# Altium PCB PCB_Interface_Board_7500-0428.PcbDoc (part 5 of 5)
Units mil, origin at the board's own origin, x right, y up, seen from the top; angles counter-clockwise.
Board outline 3850 x 4150 mil, 4 copper layers (Top Layer 1, GND+Signal, PWR+Signal, Bottom Layer 1), stack 62.449 mil thick; 247 components, 137 nets, 1675 pads, 241 vias.
Unrouted connection lines stored in the file: 122.
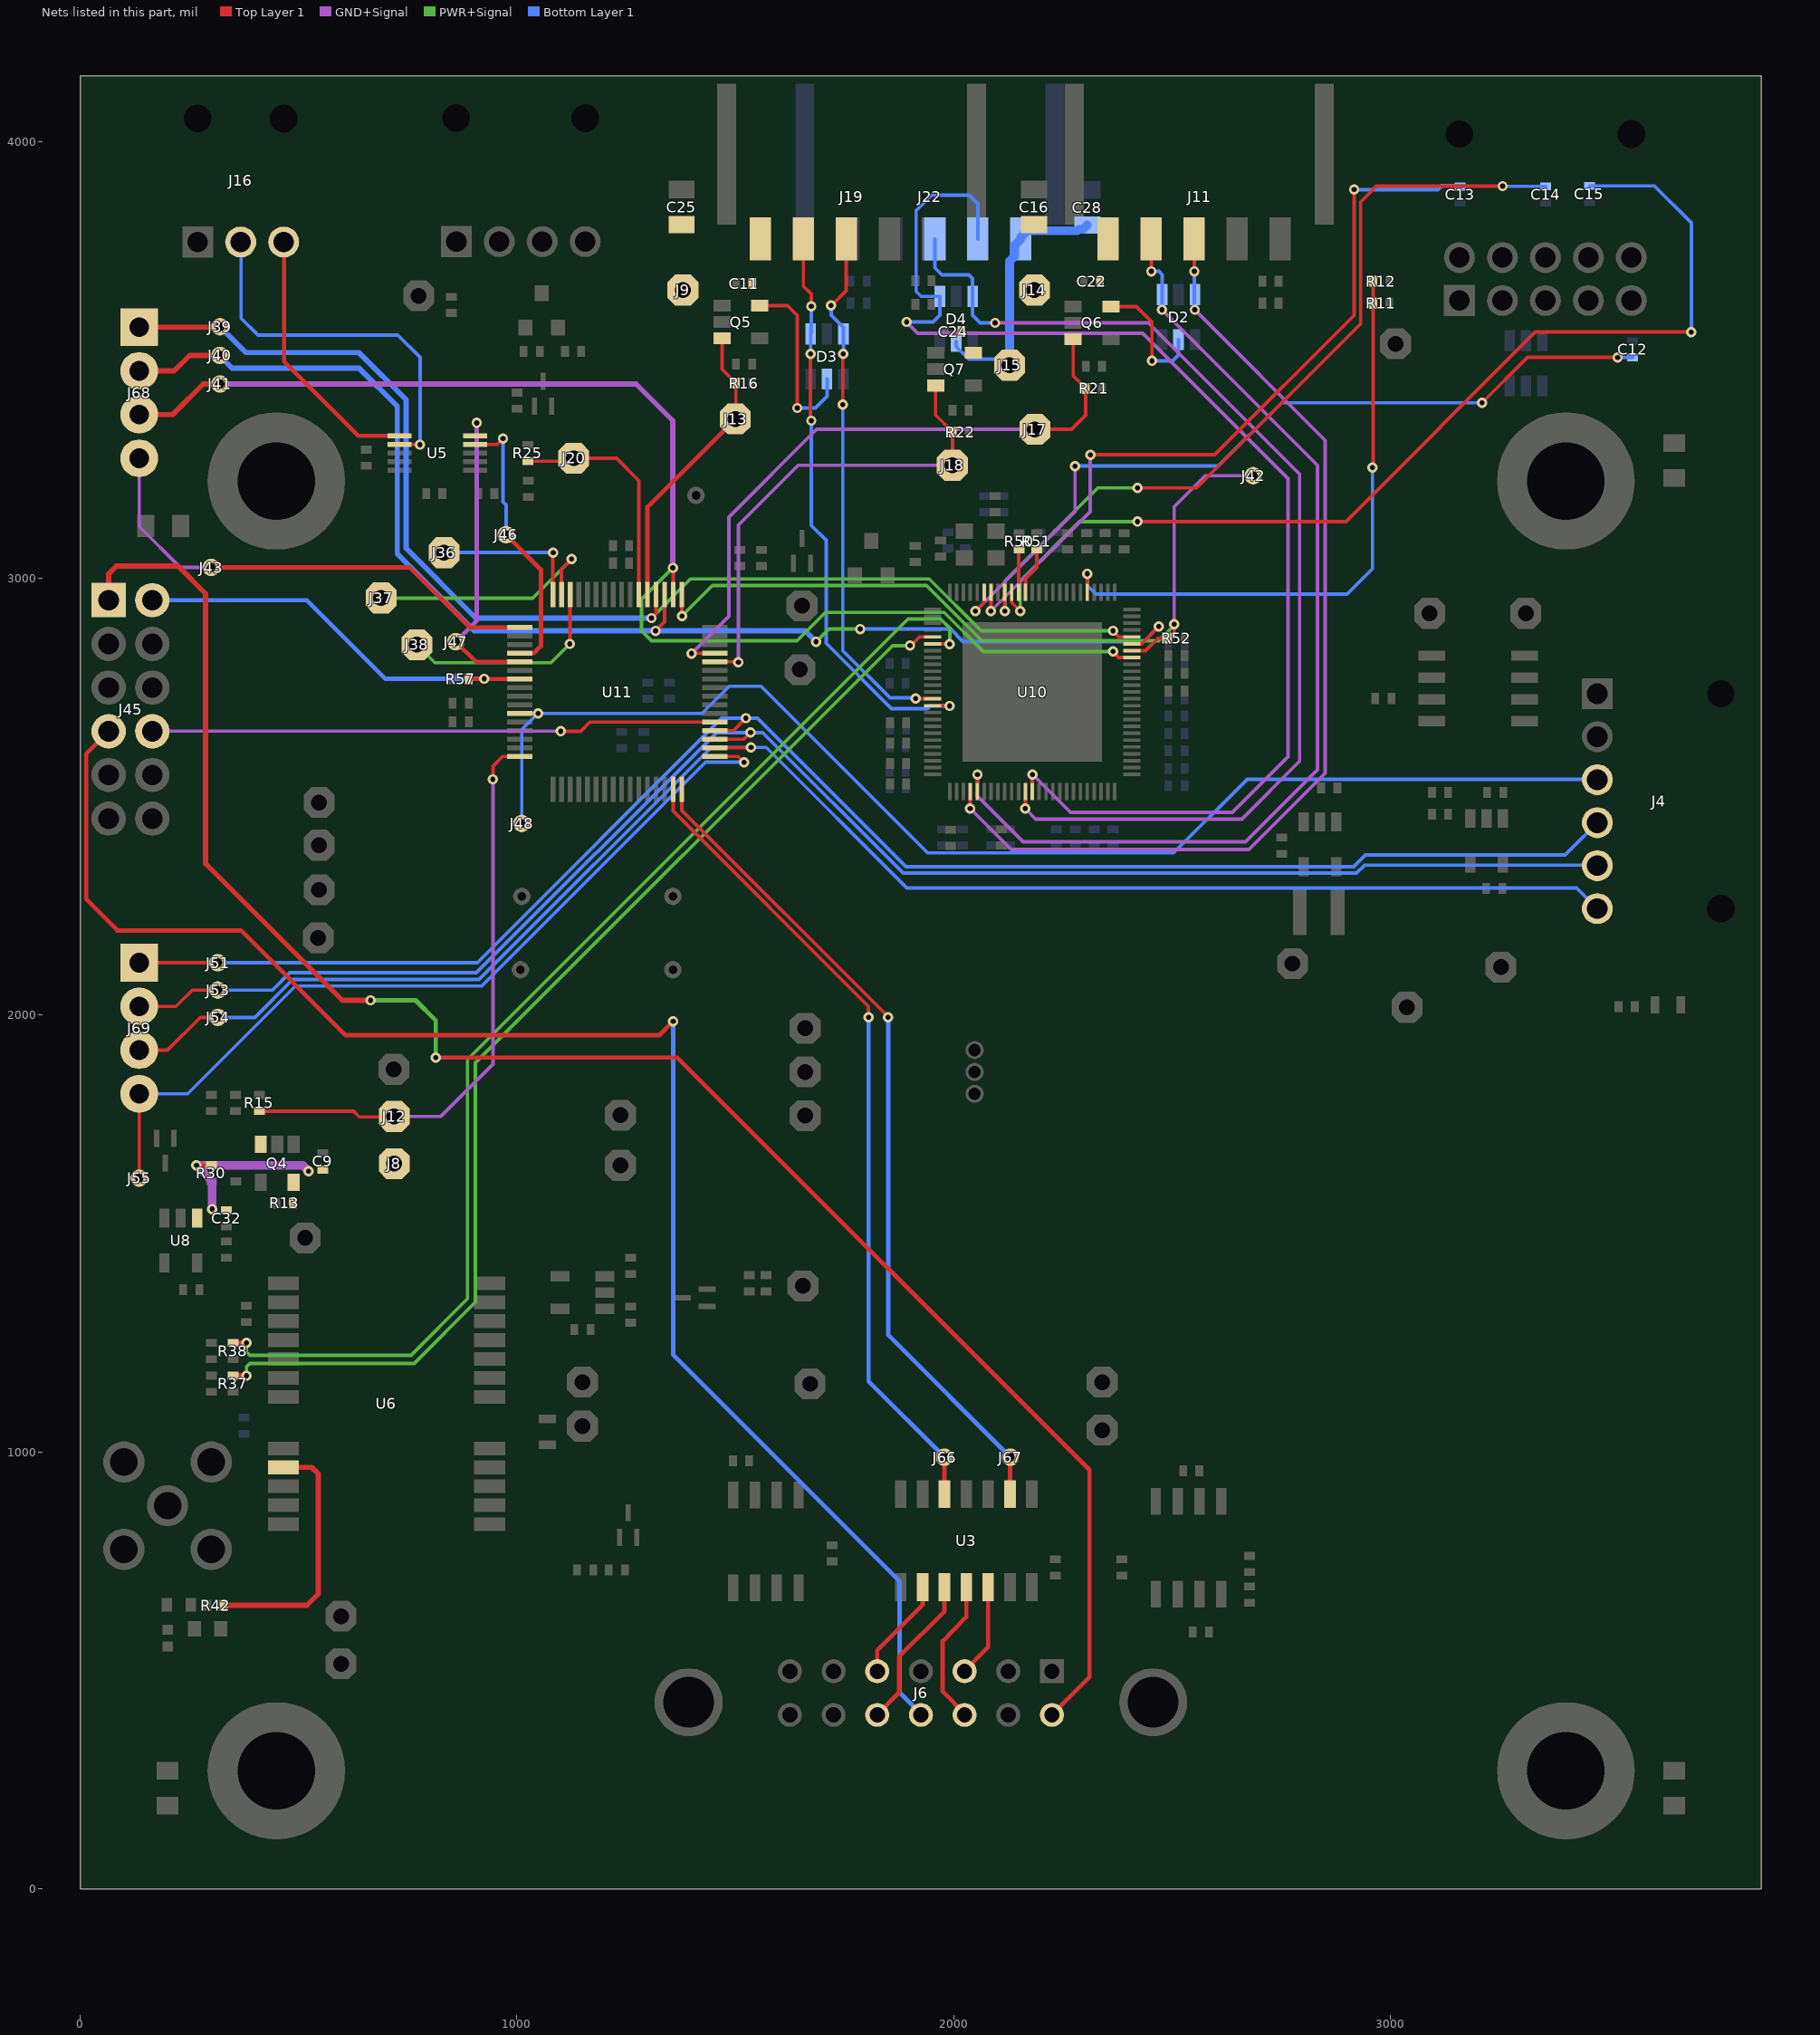
[diagram p5: the nets of this part, all layers, seen from the top]

## Via types
v1: diameter 23.62, hole 11.81, Top Layer 1 to Bottom Layer 1, tented top, 214 vias
v2: diameter 23.62, hole 11.81, Top Layer 1 to Bottom Layer 1, 27 vias

## Nets (pads, with @x,y where several pads share a name; then routed paths per layer and width w, separated by ;. In a path a pad name is that pad's centre, name@x,y a point inside that pad or via, vN(x,y) a via of type N, cw(c..) or ccw(c..) an arc to the next point about the centre after c; other vN are vias at no path point) (continued)
RB7(PGD)_IB: J45.8 U11.37 | length 1297.7
  Top Layer 1 w8: v1(1100,2650) 1146,2650 1167.1,2671.1 U11.37@1453.23,2671.1
  GND+Signal w8: J45.8@165.24,2650.24 v1@1101,2650.24
RB7(PGD)_MB: J6.8 J45.7 | length 3713.6
  Top Layer 1 w10: J45.7@65,2650 13.63,2598.63 13.63,2265.37 85,2194 368,2194 608,1954 1325.67,1954 v1(1357.67,1986)
  Bottom Layer 1 w10: v1(1357.67,1986) 1357.67,1222.76 1876,704.43 1876,450 J6.8@1926,400
RE2: J36.1 U11.64 | length 346
  Top Layer 1 w8: U11.64@1082.36,2963.23 1082.36,3058.36 v1(1083,3059)
  Bottom Layer 1 w8: J36.1@833,3059 v1(1083,3059)
RE3: J37.1 U11.63 | length 563.1
  Top Layer 1 w8: U11.63@1102.05,2963.23 1102.05,3021.05 v1(1125,3044)
  PWR+Signal w8: J37.1@689,2955 1036,2955 v1(1125,3044)
RE4: J38.1 U11.62 | length 498.3
  Top Layer 1 w8: v1(1121,2850) 1121.73,2850.73 U11.62@1121.73,2963.23
  PWR+Signal w8: J38.1@771,2848 812,2807 1078,2807 v1(1121,2850)
RS232_CH1_IN: J16.3 U5.6 | length 608.7
  Top Layer 1 w10: J16.3@466.85,3770 466.85,3496.15 636.63,3326.37 U5.6@731.38,3326.37
RS232_CH1_OUT: J16.2 U5.7 | length 868
  Top Layer 1 w8: U5.7@731.38,3306.69 777.31,3306.69 v1(778,3306)
  Bottom Layer 1 w8: J16.2@368.42,3770 368.42,3595.58 407,3557 727,3557 778,3506 v1(778,3306)
RX+: J6.5 U3.12 | length 212.7
  Top Layer 1 w10: J6.5@2026,500 2079,553 U3.12@2079,690.7
RX-: J6.6 U3.11 | length 333.6
  Top Layer 1 w10: J6.6@2026,400 1975,452.02 1975,566.94 2026.14,619 2029,621.92 U3.11@2029,690.7
S\P\I\1\_\S\S\: J4.3 J48.1 U11.11 | length 2988
  Top Layer 1 w8: U11.11@1006.77,2690.79 v1(1048.08,2690.79)
  Bottom Layer 1 w8: J48.1@1011,2439 1011,2653.71 v1(1048.08,2690.79) 1423.79,2690.79 1486,2753 1559,2753 1940.5,2371.5 2503.34,2371.5 2672.05,2540.21 J4.3@3474,2540.21
S\P\I\1\_\S\S\_\A\U\X\: J55.1 J69.4 U11.33 | length 1971.8
  Top Layer 1 w8: J55.1@130,1622 J55.1@135,1627 J69.4@135,1820 ; U11.33@1453.23,2592.36 1506.64,2592.36 v1(1520,2579)
  Bottom Layer 1 w8: J69.4@135,1820 246,1820 492.59,2066.59 919.59,2066.59 1432,2579 v1(1520,2579)
S\P\I\2\_\S\S\: J42.1 R52.1 U10.69 U11.49 | length 1887
  Top Layer 1 w8: U11.49@1377.64,2963.23 1377.64,2914.36 v1(1378,2914) ; U10.69@2408,2834.49 2439.49,2834.49 2468,2863 R52.1@2491.5,2863 2505,2876.5 v1(2505,2895)
  GND+Signal w8: v1(2505,2895) 2505,3164 2576,3235 J42.1@2686,3235
  PWR+Signal w8: v1(1378,2914) 1447.62,2983.62 1937.91,2983.62 2064.44,2857.09 2469.34,2857.09 2505,2892.74 v1(2505,2895)
S\P\I\2\_\S\S\_\A\U\X\: J43.1 J68.4 U11.1 | length 1123.7
  Top Layer 1 w10: J43.1@300,3025 755,3025 892.36,2887.64 U11.1@1006.77,2887.64
  GND+Signal w8: J68.4@135,3275 135,3118.87 228.87,3025 J43.1@300,3025
SPI1_SCK: J4.6 J54.1 J69.3 U11.34 | length 3872.9
  Top Layer 1 w8: J69.3@135,1920 200,1920 275,1995 J54.1@315,1995 ; U11.34@1453.23,2612.05 1535.05,2612.05 v1(1536,2613)
  Bottom Layer 1 w8: J54.1@315,1995 399.79,1995 486.38,2081.59 913.38,2081.59 1444.79,2613 v1(1536,2613) 1571,2613 1892.81,2291.19 3426.69,2291.19 J4.6@3481.66,2236.21
SPI1_SDI: J4.5 J53.1 J69.2 U11.35 | length 3827.8
  Top Layer 1 w8: J69.2@135,2020 219,2020 256.5,2057.5 J53.1@315,2057.5 ; U11.35@1453.23,2631.73 1519.73,2631.73 v1(1535,2647)
  Bottom Layer 1 w8: J53.1@315,2057.5 440.5,2057.5 480,2097 907.21,2097 1457.21,2647 v1(1535,2647) 1562.57,2647 1884.57,2325 2922.43,2325 2940.79,2343.36 J4.5@3474,2343.36
SPI1_SDO: J4.4 J51.1 J69.1 U11.36 | length 3855.5
  Top Layer 1 w8: J69.1@135,2120 J51.1@315,2120 ; U11.36@1453.23,2651.42 1495.42,2651.42 v1(1524,2680)
  Bottom Layer 1 w8: J51.1@315,2120 790.38,2120 790.79,2120.41 909.41,2120.41 1469,2680 v1(1524,2680) 1550.79,2680 1890.79,2340 2916.21,2340 2943.21,2367 3400.28,2367 J4.4@3487.7,2454.42
SPI2_SCK: J41.1 J68.3 U10.68 U11.50 | length 3059.5
  Top Layer 1 w8: v1(1357,3024) 1357.95,3023.05 U11.50@1357.95,2963.23 ; v1@2365,2831.73 2377.99,2818.74 U10.68@2408,2818.74
  Top Layer 1 w12: J68.3@135,3375 212,3375 282,3445 J41.1@320,3445
  GND+Signal w12: J41.1@320,3445 1273,3445 1357,3361 v1(1357,3024)
  PWR+Signal w8: v1(1357,3024) 1285.19,2952.19 1285.19,2879.77 1307.92,2857.04 1641.37,2857.04 1706.33,2922 1978.31,2922 2067.66,2832.65 v1(2365,2832.65)
SPI2_SDI: J40.1 J68.2 U10.70 U11.51 | length 3028.8
  Top Layer 1 w8: v1(1317.37,2879.85) 1338.27,2900.74 U11.51@1338.27,2963.23 ; U10.70@2408,2850.24 2430.24,2850.24 v1(2470,2890)
  Top Layer 1 w12: J68.2@135,3475 215,3475 250.5,3510.5 J40.1@320,3510.5
  PWR+Signal w8: v1(1685.08,2854.92) 1714.15,2884 v1(1786,2884)
  Bottom Layer 1 w8: v1(1786,2884) 1993,2884 2021.54,2855.46 2435.46,2855.46 v1(2470,2890)
  Bottom Layer 1 w12: J40.1@320,3510.5 320,3509 348,3481 639,3481 726,3394 726,3056 902.15,2879.85 v1(1317.37,2879.85) 1660.15,2879.85 v1(1685.08,2854.92)
SPI2_SDO: J39.1 J68.1 U10.71 U11.52 | length 2899.2
  Top Layer 1 w8: v1(1308,2909) 1318.58,2919.58 U11.52@1318.58,2963.23 ; v1@2365,2878.98 2377.99,2865.98 U10.71@2408,2865.98
  Top Layer 1 w12: J68.1@135,3575 319,3575 J39.1@320,3576
  PWR+Signal w8: v1(1308,2909) 1397.62,2998.62 1944.12,2998.62 2062.84,2879.9 v1(2365,2879.9)
  Bottom Layer 1 w12: J39.1@320,3576 379,3517 638,3517 746,3409 746,3069 906,2909 v1(1308,2909)
TEMP_PWR_EN: J20.1 R25.1 U11.54 | length 538.7
  Top Layer 1 w8: R25.1@1025,3268.35 1123.35,3268.35 J20.1@1130,3275 1228,3275 1279.21,3223.79 U11.54@1279.21,2963.23
TX+: J6.9 U3.9 | length 233.8
  Top Layer 1 w10: J6.9@1825,500 1825,545.94 1928.73,649.67 1928.73,690.43 U3.9@1929,690.7
TX-: J6.10 U3.10 | length 354.1
  Top Layer 1 w10: J6.10@1826,400 1875,449 1875,530.94 1979,634.94 U3.10@1979,690.7
UART1_RXD: J67.1 U3.2 U11.32 | length 1920.5
  Top Layer 1 w8: U11.32@1377.64,2516.77 1377.64,2468.58 1850,1996.21 v1(1850,1995)
  Top Layer 1 w10: U3.2@2129,903.3 2129,987 J67.1@2130,988
  Bottom Layer 1 w10: v1@1850,1990 1850,1268 J67.1@2130,988
UART1_TXD: J66.1 U3.5 U11.31 | length 1870.7
  Top Layer 1 w8: U11.31@1357.95,2516.77 1357.95,2467.05 1805,2020 v1(1805,1995)
  Top Layer 1 w10: U3.5@1979,903.3 J66.1@1979,988
  Bottom Layer 1 w10: v1(1805,1995) 1805,1162 J66.1@1979,988
UART2_RXD: J47.1 U5.5 U11.5 | length 686.7
  Top Layer 1 w10: J47.1@860,2855 906.1,2808.9 U11.5@1006.77,2808.9
  GND+Signal w10: J47.1@860,2855 908,2903 v1(908,3356)
UART2_TXD: J46.1 U5.4 U11.4 | length 635
  Top Layer 1 w8: U5.4@904.61,3306.69 954.69,3306.69 v1(968,3320)
  Top Layer 1 w10: J46.1@975,3100 1055,3020 1055,2845 1038.58,2828.58 U11.4@1006.77,2828.58
  Bottom Layer 1 w8: v1(968,3320) 968,3175 975,3168 J46.1@975,3100
USB2DN-1_DM: R38.2 U10.6 | length 2767.6
  Top Layer 1 w8: U10.6@1952,2850.24 v1@1990.49,2850.24
  Top Layer 1 w12: R38.2@350,1249.61 v1(380.81,1249.61)
  PWR+Signal w8: v1(380.81,1249.61) 380.81,1229.02 388.62,1221.21 757.46,1221.21 886.79,1350.54 886.79,1898.54 1895.24,2907 1970,2907 1991,2886 v1(1991,2849.72)
USB2DN-1_DP: R37.2 U10.5 | length 2635.7
  Top Layer 1 w8: v1(1900,2846) 1902.04,2846 1922.02,2865.98 U10.5@1952,2865.98
  Top Layer 1 w12: R37.2@350,1174.61 v1(380.81,1174.61)
  PWR+Signal w8: v1(380.81,1174.61) 380.81,1195.19 388.62,1203 765,1203 905,1343 905,1891 1860,2846 v1(1900,2846)
USB2DN-2_DM: D2.1 J11.2 U10.30 | length 2361.5
  Top Layer 1 w8: U10.30@2054.01,2512 v1@2054.01,2550.49 ; v1@2452.42,3703.15 J11.2@2452.42,3776.95
  GND+Signal w8: v1(2054.53,2551) 2054.53,2501.47 2158.99,2397.01 2668.54,2397.01 2832.99,2561.46 2832.99,3259.01 v1(2477,3615)
  Bottom Layer 1 w8: v1(2452.57,3703) 2470,3703 2477.6,3695.4 D2.1@2477.6,3649.57 2477.6,3615.6 v1(2477,3615)
USB2DN-2_DP: D2.3 J11.3 U10.29 | length 2310.4
  Top Layer 1 w8: v1@2038.27,2473.51 U10.29@2038.27,2512 ; J11.3@2550.85,3776.95 2550.85,3703.15 v1(2551,3703)
  GND+Signal w8: v1(2037.76,2473) 2131.76,2379 2676,2379 2851,2554 2851,3316 v1(2552,3615)
  Bottom Layer 1 w8: v1(2551,3703) 2551,3616 v1(2552,3615)
USB2DN-3_DM: D3.1 J19.2 U10.15 | length 1349
  Top Layer 1 w8: J19.2@1655.76,3776.95 1655.76,3669.24 1674,3651 v1(1674,3623) ; v1(1672.2,3514) 1672.2,3362.8 v1(1674,3361) ; U10.15@1952,2708.5 v1@1990.49,2708.5
  Bottom Layer 1 w8: v1@1672.6,3514.4 D3.1@1672.6,3559.57 ; D3.1@1672.6,3574.6 D3.1@1672.6,3559.57 ; v1(1674,3361) 1674,3121.12 1707.89,3087.24 1707.89,2851.59 1857.52,2701.95 1900.34,2701.95 1940.34,2701.95 1946.38,2707.99 v1(1991,2707.99) ; v1(1674,3623) 1674,3560.98 D3.1@1672.6,3559.57
USB2DN-3_DP: D3.3 J19.3 U10.14 | length 1224.8
  Top Layer 1 w8: v1(1719.41,3625) 1721,3625 1721,3624 1722,3623 1722,3626 1754.19,3658.19 J19.3@1754.19,3776.95 ; v1(1746,3398) 1746,3513 v1(1747,3514) ; v1@1913.51,2724.25 U10.14@1952,2724.25
  Bottom Layer 1 w8: v1(1719.41,3625) 1719.41,3602.59 1747.4,3574.6 D3.3@1747.4,3559.57 1747.4,3514.4 v1(1747,3514) ; v1(1746,3398) 1746,2834.69 1854.07,2726.62 1911.14,2726.62 v1(1913,2724.76)
USB2DN-4_DM: D4.1 J22.2 U10.38 | length 2986.7
  Top Layer 1 w8: U10.38@2180,2512 v1@2180,2550.49
  GND+Signal w8: v1(1892,3587) 1918,3561 2433,3561 2766,3228 2766,2592 2638,2464 2267.51,2464 v1(2180.51,2551)
  Bottom Layer 1 w8: v1(1892,3587) 1953,3587 1968.6,3602.6 D4.1@1968.6,3645.57 1925.43,3645.57 1914,3657 1914,3842 1949,3877 2036,3877 2055.46,3857.54 J22.2@2055.46,3776.95
USB2DN-4_DP: D4.3 J22.3 U10.37 | length 2534.7
  Top Layer 1 w8: v1@2164.25,2473.51 U10.37@2164.25,2512
  GND+Signal w8: v1(2095,3585) 2445.77,3585 2792,3238.77 2792,2581.23 2659.77,2449 2187.74,2449 v1(2163.74,2473)
  Bottom Layer 1 w8: J22.3@1957.03,3776.95 1957.03,3710.97 1973,3695 2035,3695 2043.4,3686.6 D4.3@2043.4,3645.57 2043.4,3602.6 2061,3585 v1(2095,3585)
USB2DN_VBUS1: C9.1 C32.1 J8.1 Q4.5 R13.2 R30.2 U8.1 | length 413.9
  Top Layer 1 w8: v1(266,1656) 266,1656.61 R30.2@300,1656.61 ; v1(302,1556) v1@304,1556
  GND+Signal w20: v1(302,1556) 302,1620 v1(266,1656) 510,1656 v1(523,1643)
USB2DN_VBUS2: C16.2 C22.1 D2.5 J11.1 J14.1 Q6.5 | length 298.9
  Top Layer 1 w8: Q6.5@2360.29,3622.4 2418.6,3622.4 2454,3587 v1(2454,3498)
  Bottom Layer 1 w8: v1(2454,3498) 2501.5,3498 2515,3511.5 D2.5@2515,3546.43
USB2DN_VBUS3: C11.1 C25.2 D3.5 J9.1 J19.1 Q5.5 | length 425.6
  Top Layer 1 w8: Q5.5@1556.29,3624.4 1619.6,3624.4 1642,3602 v1(1642,3390)
  Bottom Layer 1 w8: v1(1642,3390) 1683,3390 1710,3417 D3.5@1710,3456.43
USB2DN_VBUS4: C24.1 C28.2 D4.5 J15.1 J22.1 Q7.5 | length 625.8
  Bottom Layer 1 w8: D4.5@2006,3542.43 2006,3530.61 2034.9,3501.72 2114.28,3501.72 J15.1@2128,3488 J15.1@2132.81,3483.19
  Bottom Layer 1 w20: J15.1@2128,3488 2128,3726.27 2139.47,3737.74 2139.47,3762.54 J22.1@2153.88,3776.95 2153.88,3781.22 2168.29,3795.63 2282.63,3795.63 2286,3799 2296,3799 C28.2@2306,3809
USB2UP_DM: R50.1 U10.90 | length 99.1
  Top Layer 1 w8: U10.90@2148.5,2968 2148.5,3065 R50.1@2150,3066.5
USB2UP_DP: R51.1 U10.89 | length 109.2
  Top Layer 1 w8: U10.89@2164.25,2968 2164.25,2999.25 2190,3025 R51.1@2190,3066.5
USB3UP-A_RXDM: C12.2 U10.95 | length 1857.7
  Top Layer 1 w8: v1(2050,2925) 2069.76,2944.76 U10.95@2069.76,2968 ; v1(3210,3402) 3313.8,3505.8 v1(3520.4,3505.8)
  GND+Signal w8: v1(2050,2925) 2278,3153 v1(2278,3257)
  Bottom Layer 1 w8: v1(2278,3257) 2606,3257 2751,3402 v1(3210,3402) ; v1(3520.4,3505.8) C12.2@3555,3505.8
USB3UP-A_RXDP: C13.2 U10.94 | length 1767.3
  Top Layer 1 w8: v1(2085,2925) 2085.51,2925.51 U10.94@2085.51,2968 ; v1(2313,3283) 2598,3283 2917,3602 v1(2917,3890)
  GND+Signal w8: v1(2085,2925) 2313,3153 v1(2313,3283)
  Bottom Layer 1 w8: v1(2917,3890) 3109,3890 3118,3899 3158,3899 C13.2@3160,3897
USB3UP-A_TXDM: C14.2 U10.92 | length 1893.3
  Top Layer 1 w8: v1@2117.01,2925.51 U10.92@2117.01,2968 ; v1(2421,3207) 2556,3207 2932,3583 2932,3862 2968,3898 v1(3257,3898)
  PWR+Signal w8: v1(2117.52,2925) 2117.52,2994.45 2330.07,3207 v1(2421,3207) v1@2426,3207
  Bottom Layer 1 w8: v1(3257,3898) 3257.5,3897.5 C14.2@3356,3897.5
USB3UP-A_TXDP: C15.2 U10.91 | length 2411.2
  Top Layer 1 w8: U10.91@2132.76,2968 2132.76,2944.76 v1(2152.52,2925) ; v1(2421,3130) 2898,3130 3332,3564 v1(3689,3564)
  PWR+Signal w8: v1(2152.52,2925) 2152.52,2994.52 2288,3130 v1(2421,3130)
  Bottom Layer 1 w8: C15.2@3456,3898.5 3604.66,3898.5 3689,3814.16 v1(3689,3564)
V\B\U\S\1\_\F\L\T\: J12.1 Q4.3 R15.1 U11.16 | length 1343.7
  Top Layer 1 w8: R15.1@410,1780.4 625.6,1780.4 639,1767 718,1767 J12.1@719,1768 ; v1(945,2540) 945,2570 967.36,2592.36 U11.16@1006.77,2592.36
  GND+Signal w8: J12.1@719,1768 825,1768 945,1888 v1(945,2540)
V\B\U\S\2\_\F\L\T\: J17.1 Q6.3 R21.1 U11.45 | length 1501
  Top Layer 1 w8: v1(1400,2828) 1400.58,2828.58 U11.45@1453.23,2828.58 ; J17.1@2186,3341 2270,3341 2302.6,3373.6 R21.1@2302.6,3435 2273.71,3463.89 Q6.3@2273.71,3547.6
  GND+Signal w8: v1(1400,2828) 1485,2913 1485,3140 1686,3341 J17.1@2186,3341
V\B\U\S\3\_\F\L\T\: J13.1 Q5.3 R16.1 U11.53 | length 710.3
  Top Layer 1 w8: Q5.3@1469.71,3549.6 1469.71,3478.6 R16.1@1501.5,3446.81 J13.1@1501.5,3337.49
  Top Layer 1 w10: U11.53@1298.9,2963.23 1298.9,3163.9 J13.1@1500,3365
V\B\U\S\4\_\F\L\T\: J18.1 Q7.3 R22.1 U11.44 | length 1124.6
  Top Layer 1 w8: U11.44@1453.23,2808.9 1506.1,2808.9 v1(1507,2808) ; Q7.3@1958.71,3441.6 1958.71,3373.89 R22.1@1997.6,3335 J18.1@1997.6,3248
  GND+Signal w8: v1(1507,2808) 1507,3122 1644,3259 J18.1@1997,3259
VBUS_MON_UP: R11.2 R12.1 U10.80 | length 1412.9
  Top Layer 1 w8: U10.80@2305.98,2968 v1(2305.98,3010.45) ; v1(2959,3254) 2960.39,3255.39 R11.2@2960.39,3630 R12.1@2960.39,3680
  Bottom Layer 1 w8: v1(2305.98,3010.45) 2305.98,2983.75 2325.73,2964 2901,2964 2959,3022 v1(2959,3254)
VCC_RF: R42.1 U6.9 | length 588.4
  Top Layer 1 w12: R42.1@328.5,649 519,649 545,675 545,950 530.26,964.74 U6.9@465,964.74
VPP: J45.2 R57.2 U11.7 | length 952
  Top Layer 1 w10: R57.2@889.5,2770 889.97,2769.53 U11.7@1006.77,2769.53
  Bottom Layer 1 w10: J45.2@165,2950 519,2950 699,2770 v1(925,2770)
VPP_MB: J6.2 J45.1 | length 4179.3
  Top Layer 1 w10: v1(814,1903) 1367,1903 2311,959 2311,485 J6.2@2226,400
  Top Layer 1 w12: J45.1@65,2950 65,3010 83,3028 224,3028 287,2965 287,2347 600,2034 v1(665,2034) v1@667,2032
  PWR+Signal w10: v1(665,2034) 768,2034 814,1988 v1(814,1903)
pads on no net: D1.4 D1.6 D2.4 D2.6 D3.4 D3.6 D4.4 D4.6 J4.7 J4.8 J6.15 J6.16 J10.10 J10.11 J10.12 J11.S1 J11.S2 J16.7 J16.8 J19.S1 J19.S2 J21.7 J21.8 J22.S1 J22.S2 J45.11 J45.12 U1.4 U3.1 U3.8 U3.13 U6.1 U6.2 U6.14 U6.17 U6.18 U6.19 U7.4 U8.4 U10.2 U10.3 U10.4 U10.7 U10.8 U10.10 U10.11 U10.12 U10.13 U10.16 U10.17 U10.19 U10.20 U10.23 U10.27 U10.28 U10.31 U10.32 U10.34 U10.35 U10.36 U10.39 U10.40 U10.42 U10.43 U10.45 U10.46 U10.47 U10.48 U10.49 U10.50 U10.51 U10.52 U10.54 U10.57 U10.61 U10.66 U10.72 U10.73 U10.74 U10.75 U10.76 U10.77 U10.81 U10.82 U10.84 U10.85 U10.87 U10.88 U10.97 U11.2 U11.3 U11.6 U11.8 U11.40 U11.43 U11.46 U11.47 U11.55 U11.58 U11.59 U11.60 U11.61

## Polygon pours and split planes (outlines as drawn)
GND on PWR+Signal "GND_L03_P011" (solid, pour order 11): 0,0 0,4150 3850,4150 3850,0
5V on PWR+Signal "5V_L03_P008" (solid, pour order 8): 249,676 249,3545 3556,3545 3556,676
3V3 on PWR+Signal "Polygon_1_Net_3.3V" (solid, remove dead copper, pour order 0): 1743,3215 2551,3215 2551,2555 3353,2555 3353,2045 3047,2045 3047,2398 1743,2398
GND on Top Layer 1 "GND_L01_P003" (solid, remove dead copper, pour order 3): 0,0 0,4150 3850,4150 3850,0
USB2DN_VBUS1 on Top Layer 1 "USB2DN_VBUS1_L01_P007" (solid, remove dead copper, pour order 7): 790,1696 790,1608 589,1608 589,1553 470,1553 470,1659 647,1659 647,1714 789,1714
GNSS_VDDUSB_3V3 on Top Layer 1 "GNSS_VDDUSB_3V3_L01_P006" (solid, remove dead copper, pour order 6): 500,1140 500,1095 185,1095 185,1330 255,1330 255,1460 445,1460 445,1540 575,1540 575,1425 355,1425 355,1285 250,1285 250,1130 430,1130 430,1140
GNSS_VCC_3V3 on Top Layer 1 "GNSS_VCC_3V3_L01_P005" (solid, remove dead copper, pour order 5): 898,1361 898,1284 1104,1284 1104,1117 1187,1117 1187,1230 1143,1230 1143,1360 899,1360
GND on GND+Signal "GND_L02_P009" (solid, pour order 9): 0,0 0,4150 3850,4150 3850,0
1V2 on GND+Signal "Polygon_1_Net_1.2V" (solid, remove dead copper, pour order 1): 2705,2355 3005,2355 3005,2045 1556,2045 1556,3255 2705,3255 2705,2645
GND on Bottom Layer 1 "GND_L04_P004" (solid, remove dead copper, pour order 4): 0,0 0,4150 3850,4150 3850,0

## Other copper
Top Layer 1:
  rectangle net 1V2: 2245,3056 2405,3079
  rectangle net GND: 2245,3093 2405,3116
  rectangle net NetJ34_1: 1825,2925 1930,3050
  rectangle net NetQ12_1: 1495,3010 1640,3045
  rectangle net 3V3: 2075,3030 2120,3165
  rectangle net -5V_MB: 2369,642 2475,728
  rectangle net NetJ29_1: 1049,1052 1093,1087
  rectangle net GNSS_ANT_OK: 900,948.31 1015,982.31
  rectangle net NetLED1_1: 3550,1996 3625,2050
  rectangle net 5V: 2992,2697 3136.7,2984
  rectangle net PWR_IN_5V: 3325,2695 3519,2776
  rectangle net PWR_IN_5V: 3247,2643 3359,2986
  rectangle net UART2_RXD: 877,3322 938,3372
  rectangle net USB2DN_VBUS2: 2145.25,3758 2370,3794
  rectangle net GND: 2826.6,2417 2853.6,2562
  rectangle net 5V: 2864,2417 2891,2562
  rectangle net 1V2: 2735,2083 2816.2,2382
  region net NetL1_1: 2902,2365 2861.8,2365 2861.8,2181 2902,2181
  region net 3V3: 3269.8,2373 3242.8,2373 3242.8,2088 3269.8,2088
  rectangle net GND: 3207.6,2228 3234.6,2570
  rectangle net 5V: 3245,2425 3272,2570
  rectangle net NetR5_2: 3123,2422 3196,2526
  rectangle net 5V: 864,3178 932,3254
  rectangle net USB2DN_VBUS3: 1338,3758 1586,3794
  rectangle net 5V: 1075,3507 1121,3593
  rectangle net 5V: 1044,3507 1121,3539
  rectangle net NetQ8_3: 1001,3506 1034,3596
  rectangle net V\B\U\S\1\_\F\L\T\: 391,1684 428,1791
  rectangle net USB2DN_VBUS1: 252,1544 351,1569
  rectangle net USB2DN_VBUS1: 252,1509 297,1569
  rectangle net 5V: 340,1603 458,1639
  rectangle net 5V: 388,1557 458,1639
  rectangle net NetC17_2: 2726.66,3607 2769.66,3828
  rectangle net USB2DN_VBUS4: 2008,3480 2035,3581
  rectangle net 5V: 2016.1,3319 2069,3461
  rectangle net USB2DN_VBUS4: 2084,3435 2172,3480
  rectangle net USB2DN_VBUS4: 2008,3480 2172,3549
  rectangle net NetC27_2: 1930,3607 1973,3828
  rectangle net 5V: 1523,3420 1628,3567
  rectangle net USB2DN_VBUS3: 1529.34,3608 1587.34,3827
  rectangle net USB2DN_VBUS3: 1337,3614.6 1418.71,3833.6
  rectangle net USB2DN_VBUS2: 2142,3614.6 2223.71,3833.6
  rectangle net USB2DN_VBUS2: 2326,3608 2384,3827
  rectangle net 5V: 2327,3418 2381,3565
  rectangle net PC_VBUS: 2988,3495 3037,3647
  rectangle net GNSS_ANT_DET: 900,905 1015,939
  rectangle net NetC34_1: 240,575 300,675
  rectangle net 5V: 1179,1315 1276,1344
  rectangle net 5V: 1246,1326 1276,1417
  rectangle net NetQ2_4: 1249,841 1268,882
  rectangle net 5V_MB: 1463,581 1737,758
  rectangle net 5V: 1522,870 1664.5,993
Bottom Layer 1:
  region net 3V3: 2504,2438 2306.6,2438 2306.6,2415 2504,2415
  region net 3V3: 2504,2421 2504,2579.96 2481,2579.96 2481,2421
  rectangle net 1V2: 2056,3142.5 2128,3161
  region net 1V2: 2294.2,2438 2073,2438 2073,2415 2294.2,2415
  region net GND: 2363,3118 2182,3118 2182,3095 2363,3095
  rectangle net 1V2: 1880,2744 1902,2821
  rectangle net 3V3: 1970,3056 2044,3081
  region net 3V3: 2363,3081 2182,3081 2182,3058 2363,3058
  rectangle net 5V: 1285,2713.15 1389,2734.15
  region net 1V2: 1904,2471 1904,2670 1881,2670 1881,2471
  region net 3V3: 2479,2850.85 2479,2669.85 2502,2669.85 2502,2850.85
  rectangle net 5V: 1260,2558 1304,2621
  rectangle net 5V: 1225,2600 1304,2621
  rectangle net 1V2: 2480,2590 2502,2660.89
  rectangle net 3V3: 1934.6,2413 2035,2436
  rectangle net GND: 1225,2637 1304,2658
  rectangle net PC_VBUS: 3295,3402.49 3325.43,3465
  rectangle net GNSS_VCC_3V3: 314,1060 390.98,1094
  rectangle net GNSS_ANT_OK: 983,948 1015,981
  region net NetC29_2: 1781.22,3828 1738.22,3828 1738.22,3607 1781.22,3607
  rectangle net PC_VBUS: 2913,3477 3194,3676
  rectangle net GNSS_ANT_DET: 983,905 1015,938

## Silkscreen, mask and mechanical layers (free items; w line width, h text height)
Top Overlay:
  region: 3764.14,1543.51 3634.14,1543.51 3634.14,1943.51 3764.14,1943.51
  lines w8: 3624.14,718.51 3704.14,813.51 3794.14,733.51 3722.14,733.51 3722.14,768.51 3686.14,768.51 3686.14,668.51 3722.14,668.51 3722.14,703.51 3794.14,703.51 3704.14,623.51 3624.14,718.51
  text "VBUS2" at 2093,3712.7 h60
  text "VBUS3" at 1298,3710.7 h60
  text "EXTTEMP5V" at 412,3628.7 h60
  text "SDO2" at 354,3560.7 h60
  text "VBUS4" at 2047,3555.7 h60
  text "SDI2" at 352,3492.5 h60
  text "PCVBUS" at 2922,3449.7 h60
  text "SCK2" at 355,3430.7 h60
  text "!VBUS3FLT" at 1544,3347.7 h60
  text "!VBUS2FLT" at 2231.41,3322.96 h60
  text "TEMPPWREN" at 1174,3257 h60
  text "!VBUS4FLT" at 1666.41,3238.96 h60
  text "!HUBRES" at 1162,3140.7 h60
  text "TXD2" at 1007,3081 h60
  text "RE2" at 687,3036 h60
  text "!SS2" at 335,3010.7 h60
  text "RE3" at 543,2932.7 h60
  text "5V" at 3137.33,2902.03 h60
  text "PWRIN5V" at 3357.33,2902.03 h60
  text "RXD2" at 809,2898 h60
  text "!URST" at 1606,2848.7 h60
  text "RE4" at 625,2825 h60
  text "ATTEST" at 1549,2707.7 h60
  text "RF6" at 594.33,2469.03 h60
  text "RF5" at 594.33,2371.03 h60
  text "!SS" at 966.33,2367.03 h60
  text "RF4" at 594.33,2268.32 h60
  text "!GNSSRES" at 1042,2257.7 h60
  text "EXTTEMP" at 1392,2257 h60
  text "RA1" at 592.33,2158.32 h60
  text "SDO1" at 350,2105.7 h60
  text "1V2" at 2823.32,2099.32 h60
  text "3V3" at 3300.32,2092.03 h60
  text "ANTOK" at 1392,2089.7 h60
  text "ANTDET" at 1043,2089 h60
  text "SDI1" at 350,2043.2 h60
  text "GND" at 3092.32,2005.03 h60
  text "SCK1" at 350,1980.7 h60
  text "RC1" at 1707.33,1951.97 h60
  text "VBUSEN" at 765.33,1858.03 h60
  text "RA4" at 1707.33,1851.32 h60
  text "GNSSTX" at 1282.43,1753.49 h60
  text "RA5" at 1707.33,1752.03 h60
  text "!VBUS1FLT" at 765.83,1749.53 h60
  text "VBUS1" at 766.33,1642.03 h60
  text "GNSSRX" at 1282.43,1638.49 h60
  text "!SS1" at 6,1608.7 h60
  text "GNSSRVDD" at 562.33,1472.03 h60
  text "PWREN" at 1702.33,1361.32 h60
  text "GNSS3V3" at 1197.33,1142.03 h60
  text "5VMB" at 2387.33,1142.03 h60
  text "MBPWREN" at 1718.33,1137.32 h60
  text "GNSSPLS" at 1197.33,1041.03 h60
  text "-5VMB" at 2387.33,1032.03 h60
  text "TX" at 1948,1021 h60
  text "RX" at 2099,1021 h60
  text "TransTech Systems, Inc" at 3661.14,838.51 h29.75 r90
  text "PCB: 1700-0002 REV. A" at 3711.14,838.51 h29.75 r90
  text "PCA: 7500-0428 REV. A" at 3761.14,838.51 h29.75 r90
  text "GNSSINT" at 641.33,602.33 h60
  text "GNSSGND" at 644.33,497.03 h60
  text "PCB Edge" at 1710.57,34.17 h39.37
Board Outline:
  the board outline again, w10
Fabrication:
  drawing of 295 lines, arcs and shapes, not listed
  text "Layer" at 4321.58,1416 h60
  text "Name" at 4731.49,1416 h60
  text "Material" at 5661.23,1416 h60
  text "Thickness" at 6521,1416 h60
  text "Constant" at 7170.84,1416 h60
  text "Board Layer Stack" at 7740.7,1416 h60
  text "Top Overlay" at 4731.49,1296 h60
  text "Top Solder" at 4731.49,1176 h60
  text "Solder Resist" at 5661.23,1176 h60
  text "0.40mil" at 6521,1176 h60
  text "3.5" at 7170.84,1176 h60
  text "1" at 4321.58,1056 h60
  text "Top Layer 1" at 4731.49,1056 h60
  text "CF-004" at 5661.23,1056 h60
  text "1.38mil" at 6521,1056 h60
  text "Dielectric 2" at 4731.49,936 h60
  text "PP-006" at 5661.23,936 h60
  text "8.28mil" at 6521,936 h60
  text "4.1" at 7170.84,936 h60
  text "2" at 4321.58,816 h60
  text "GND+Signal" at 4731.49,816 h60
  text "0.60mil" at 6521,816 h60
  text "Dielectric 1" at 4731.49,696 h60
  text "FR-4" at 5661.23,696 h60
  text "41.93mil" at 6521,696 h60
  text "4.8" at 7170.84,696 h60
  text "3" at 4321.58,576 h60
  text "PWR+Signal" at 4731.49,576 h60
  text "0.60mil" at 6521,576 h60
  text "Dielectric 3" at 4731.49,456 h60
  text "PP-006" at 5661.23,456 h60
  text "8.28mil" at 6521,456 h60
  text "4.1" at 7170.84,456 h60
  text "4" at 4321.58,336 h60
  text "Bottom Layer 1" at 4731.49,336 h60
  text "CF-004" at 5661.23,336 h60
  text "1.38mil" at 6521,336 h60
  text "Bottom Solder" at 4731.49,216 h60
  text "Solder Resist" at 5661.23,216 h60
  text "0.40mil" at 6521,216 h60
  text "3.5" at 7170.84,216 h60
  text "Bottom Overlay" at 4731.49,96 h60
  text "Total board thickness:" at 4321.58,-24 h60
  text "63.25mil" at 6521,-24 h60
Mechanical 4:
  circle w0.5: c3402,270 r157.48
Top 3D Body:
  drawing of 416 lines, arcs and shapes, not listed
  text "J8" at 1319.79,4053.04 h63.75
  text "J7" at 2119.79,4053.04 h63.75
  text "1" at 180,3800 h42.5 r180
  text "1" at 770,3800 h42.5 r180
  text "1" at 1440,3780 h42.5 r180
  text "1" at 2240,3780 h42.5 r180
  text "1" at 2270,3780 h42.5 r180
  text "1" at 3070,3710 h42.5 r180
  text "5" at 3680,3710 h42.5 r180
  text "1" at 110,3675 h42.5 r270
  text "1" at 1475,3639 h25.5 r90
  text "1" at 1955,3639 h25.5
  text "1" at 2275,3639 h25.5 r90
  text "1" at 2460,3639 h25.5
  text "VBUS3" at 1195.93,3580.36 h42.5
  text "VBUS2" at 2008.93,3561.36 h42.5
  text "1" at 1660,3549 h25.5
  text "1" at 1970,3534 h25.5 r90
  text "1" at 3260,3519 h25.5
  text "PCVBUS" at 2687.44,3510.36 h42.5
  text "VBUS4" at 2068.97,3398.57 h34
  text "!VB3FLT" at 1550,3340.36 h42.5
  text "!VB2FLT" at 2495,3325.71 h42.5
  text "1" at 894,3242 h25.5 r270
  text "!VB4FLT" at 1683.28,3225.36 h42.5
  text "TMPWREN" at 599.92,3201.07 h42.5
  text "PIC_RE4" at 601.93,3072.75 h29.75
  text "1" at 38,3050 h42.5 r270
  text "2" at 138,3050 h42.5 r270
  text "76" at 2376,2988 h29.75
  text "5VIN" at 3164.5,2970 h42.5
  text "49" at 1389,2949 h29.75
  text "1" at 1936,2940 h29.75
  text "PIC_RE3" at 461.93,2927.75 h29.75
  text "1" at 1023,2899 h29.75
  text "5V" at 2962.39,2895.36 h42.5
  text "PIC_RE2" at 521.93,2852.75 h29.75
  text "!URST" at 1598.14,2847.5 h29.75
  text "1" at 3107,2842 h29.75 r90
  text "1" at 3548,2835 h68 r90
  text "ATEST" at 1624.23,2707.5 h29.75
  text "33" at 1437,2543 h29.75
  text "51" at 2426,2506 h29.75
  text "17" at 1073,2495 h29.75
  text "PIC_RF6" at 598.93,2482.75 h29.75
  text "26" at 1984,2456 h29.75
  text "1" at 2890,2446 h25.5
  text "1" at 3274,2442 h29.75
  text "PIC_RF5" at 597.93,2382.75 h29.75
  text "PIC_RF4" at 598.93,2281.75 h29.75
  text "1" at 110,2220 h42.5 r270
  text "PIC_RA1" at 609.84,2182.75 h29.75
  text "1V2" at 2783.49,2010.71 h42.5
  text "3V3" at 3199.95,2005.71 h42.5
  text "K" at 3705,1995 h29.75 r180
  text "PIC_RC1" at 1710,1952.75 h29.75
  text "GND" at 2989.95,1915.71 h42.5
  text "!GNSSVBEN" at 765,1855.36 h42.5
  text "PIC_RA4" at 1710,1852.75 h29.75
  text "PIC_RA5" at 1710,1752.75 h29.75
  text "!VB1FLT" at 765,1745.36 h42.5
  text "GNSSRX" at 1310,1745.36 h42.5
  text "1" at 2073,1720 h42.5 r90
  text "1" at 504,1705 h25.5
  text "VBUS1" at 760,1635.36 h42.5
  text "GNSSTX" at 1310,1635.36 h42.5
  text "1" at 284,1527 h29.75
  text "GNSSVDDU" at 565,1465.36 h42.5
  text "1" at 451.97,1413.15 h29.75 r180
  text "24" at 948.03,1413.15 h29.75 r180
  text "!GNSSPWREN" at 1705,1355.36 h42.5
  text "1" at 1192,1311 h29.75 r270
  text "GNSS3V3" at 1200,1135.36 h42.5
  text "MBPWREN" at 1705,1135.36 h42.5
  text "5VMB" at 2403.71,1135.36 h42.5
  text "GNSSPLS" at 1200,1035.36 h42.5
  text "K" at 1100,1025 h25.5 r180
  text "-5VMB" at 2395,1025.36 h42.5
  text "1" at 1662,883 h29.75
  text "1" at 2195,882 h29.75
  text "1" at 2626,882 h29.75
  text "12" at 451.97,806.85 h29.75 r180
  text "13" at 948.03,806.85 h29.75 r180
  text "GNSSINT" at 510,615.36 h42.5
  text "1" at 2675,550 h51 r180
  text "GNSSGND" at 510,505.36 h42.5
  text "13" at 1512.07,478.78 h42.58
  text "1" at 2277.58,472.92 h42.53
  text "14" at 1512.01,378.99 h42.52
  text "2" at 2277.12,372.97 h42.55
Mechanical 8:
  lines w10: 0,4150 0,4780 ; 3402,-770 3402,270 5310,270 ; 3850,0 3850,2085
Top Value:
  the board outline again, w0.5
Top Glue Points:
  lines w6: 3508,188 3522,188 ; 3508,272 3522,272 ; 3522,138 3522,188 ; 3522,322 3522,272 ; 3572,372 3622,372 ; 3622,230 3622,372 ; 3622,388 3622,372 ; 3650,188 3522,188 ; 3650,250 3778,250 ; 3678,230 3678,372 ; 3678,388 3678,372 ; 3728,372 3678,372 ; 3778,272 3522,272 ; 3522,188 3518,178 3528,178 3522,188 ; 3522,272 3518,282 3528,282 3522,272 ; 3622,372 3612,368 3612,378 3622,372 ; 3678,372 3688,368 3688,378 3678,372
  text "0.055in/1.397mm" at 3662,392 h21.25 r90
  text "0.085in/2.159mm" at 3502,71 h21.25 r90
Bottom 3D Body:
  text "J3" at 71.07,4054.31 h63.75
Route Tool Path:
  circle w0.5: c3402,270 r157.48
  lines w0.5: 0,0 3850,0 3850,4150 0,4150 0,0
Drill Drawing:
  circle w10: c4364.62,3423.27 r20
  circle w10: c4364.62,3423.27 r33.33
  circle w10: c4364.62,2673.28 r33.33
  lines w10: 4331.29,2356.61 4347.96,2356.61 4347.96,2339.94 4381.29,2339.94 4381.29,2356.61 4397.96,2356.61 4397.96,2389.94 4381.29,2389.94 4381.29,2406.61 4347.96,2406.61 4347.96,2389.94 4331.29,2389.94 4331.29,2356.61 ; 4331.29,2489.94 4397.96,2489.94 4397.96,2556.61 4331.29,2556.61 4331.29,2489.94 ; 4331.29,2856.61 4397.96,2856.61 4364.62,2789.94 4331.29,2856.61 ; 4331.29,2939.94 4364.62,2956.61 4397.96,2939.94 4381.29,2973.28 4397.96,3006.61 4364.62,2989.94 4331.29,3006.61 4347.96,2973.28 4331.29,2939.94 ; 4331.29,3123.27 4364.62,3089.94 4397.96,3123.27 4364.62,3156.61 4331.29,3123.27 ; 4331.29,3239.94 4331.29,3256.61 4347.96,3273.27 4331.29,3289.94 4331.29,3306.61 4347.96,3306.61 4364.62,3289.94 4381.29,3306.61 4397.96,3306.61 4397.96,3289.94 4381.29,3273.27 4397.96,3256.61 4397.96,3239.94 4381.29,3239.94 4364.62,3256.61 4347.96,3239.94 4331.29,3239.94 ; 4331.29,3556.61 4347.96,3556.61 4364.62,3539.94 4381.29,3556.61 4397.96,3556.61 4381.29,3573.27 4397.96,3589.94 4381.29,3589.94 4364.62,3606.61 4347.96,3589.94 4331.29,3589.94 4347.96,3573.27 4331.29,3556.61 ; 4331.29,3756.61 4397.96,3756.61 4364.62,3689.94 4331.29,3756.61 ; 4331.29,3839.94 4397.96,3839.94 4397.96,3906.61 4331.29,3906.61 4331.29,3839.94 ; 4331.29,4006.61 4347.96,4006.61 4347.96,3989.94 4381.29,3989.94 4381.29,4006.61 4397.96,4006.61 4397.96,4039.94 4381.29,4039.94 4381.29,4056.61 4347.96,4056.61 4347.96,4039.94 4331.29,4039.94 4331.29,4006.61 ; 4344.62,2363.28 4354.62,2363.28 4354.62,2353.28 4374.62,2353.28 4374.62,2363.28 4384.62,2363.28 4384.62,2383.28 4374.62,2383.28 4374.62,2393.28 4354.62,2393.28 4354.62,2383.28 4344.62,2383.28 4344.62,2363.28 ; 4344.62,2843.28 4384.62,2843.28 4364.62,2803.28 4344.62,2843.28 ; 4344.62,3853.27 4384.62,3853.27 4384.62,3893.27 4344.62,3893.27 4344.62,3853.27
  lines w15: 4271.5,2294.94 17879.66,2294.94 ; 4271.5,4094.94 17879.66,4094.94 ; 4822.38,2144.94 4822.38,4244.94 ; 5422.22,2144.94 5422.22,4244.94 ; 6561.88,2144.94 6561.88,4244.94 ; 7067.76,2144.94 7067.76,4244.94 ; 7801.56,2144.94 7801.56,4244.94 ; 9521.04,2144.94 9521.04,4244.94 ; 10110.89,2144.94 10110.89,4244.94 ; 10856.69,2144.94 10856.69,4244.94 ; 11866.4,2144.94 11866.4,4244.94 ; 12720.16,2144.94 12720.16,4244.94 ; 14053.77,2144.94 14053.77,4244.94 ; 15387.38,2144.94 15387.38,4244.94 ; 16477.06,2144.94 16477.06,4244.94 ; 4271.5,2144.94 17879.66,2144.94 17879.66,4244.94 4271.5,4244.94 4271.5,2144.94
  text "Symbol" at 4361.5,4139.94 h72
  text "Count" at 4867.38,4139.94 h72
  text "Hole Size" at 5467.22,4139.94 h72
  text "Plated" at 6606.88,4139.94 h72
  text "Hole Type" at 7112.76,4139.94 h72
  text "Drill Layer Pair" at 7846.56,4139.94 h72
  text "Via/Pad" at 9566.04,4139.94 h72
  text "Pad Shape" at 10155.89,4139.94 h72
  text "Template" at 10901.69,4139.94 h72
  text "Description" at 11911.4,4139.94 h72
  text "Hole Tolerance (+)" at 12765.16,4139.94 h72
  text "Hole Tolerance (-)" at 14098.77,4139.94 h72
  text "Hole Length" at 15432.38,4139.94 h72
  text "Routed Path Length" at 16522.06,4139.94 h72
  text "2" at 4867.38,3989.94 h60
  text "2.946mm (116.00mil)" at 5467.22,3989.94 h60
  text "PTH" at 6606.88,3989.94 h60
  text "Round" at 7112.76,3989.94 h60
  text "Top Layer 1 - Bottom Layer 1" at 7846.56,3989.94 h60
  text "Pad" at 9566.04,3989.94 h60
  text "Rounded" at 10155.89,3989.94 h60
  text "c396h295" at 10901.69,3989.94 h60
  text "-" at 15432.38,3989.94 h60
  text "-" at 16522.06,3989.94 h60
  text "3" at 4867.38,3839.94 h60
  text "0.720mm (28.35mil)" at 5467.22,3839.94 h60
  text "PTH" at 6606.88,3839.94 h60
  text "Round" at 7112.76,3839.94 h60
  text "Top Layer 1 - Bottom Layer 1" at 7846.56,3839.94 h60
  text "Pad" at 9566.04,3839.94 h60
  text "Rounded" at 10155.89,3839.94 h60
  text "c105h72" at 10901.69,3839.94 h60
  text "-" at 15432.38,3839.94 h60
  text "-" at 16522.06,3839.94 h60
  text "4" at 4867.38,3689.94 h60
  text "1.600mm (62.99mil)" at 5467.22,3689.94 h60
  text "NPTH" at 6606.88,3689.94 h60
  text "Slot" at 7112.76,3689.94 h60
  text "Top Layer 1 - Bottom Layer 1" at 7846.56,3689.94 h60
  text "Pad" at 9566.04,3689.94 h60
  text "Rounded" at 10155.89,3689.94 h60
  text "c0hn160_175m8p-1" at 10901.69,3689.94 h60
  text "1.750mm (68.90mil)" at 15432.38,3689.94 h60
  text "0.150mm (5.91mil)" at 16522.06,3689.94 h60
  text "4" at 4867.38,3539.94 h60
  text "1.620mm (63.78mil)" at 5467.22,3539.94 h60
  text "NPTH" at 6606.88,3539.94 h60
  text "Round" at 7112.76,3539.94 h60
  text "Top Layer 1 - Bottom Layer 1" at 7846.56,3539.94 h60
  text "Pad" at 9566.04,3539.94 h60
  text "Rounded" at 10155.89,3539.94 h60
  text "c0hn162m8p-1" at 10901.69,3539.94 h60
  text "-" at 15432.38,3539.94 h60
  text "-" at 16522.06,3539.94 h60
  text "4" at 4867.38,3389.94 h60
  text "4.500mm (177.17mil)" at 5467.22,3389.94 h60
  text "PTH" at 6606.88,3389.94 h60
  text "Round" at 7112.76,3389.94 h60
  text "Top Layer 1 - Bottom Layer 1" at 7846.56,3389.94 h60
  text "Pad" at 9566.04,3389.94 h60
  text "Rounded" at 10155.89,3389.94 h60
  text "c800h450" at 10901.69,3389.94 h60
  text "-" at 15432.38,3389.94 h60
  text "-" at 16522.06,3389.94 h60
  text "5" at 4867.38,3239.94 h60
  text "1.600mm (62.99mil)" at 5467.22,3239.94 h60
  text "PTH" at 6606.88,3239.94 h60
  text "Round" at 7112.76,3239.94 h60
  text "Top Layer 1 - Bottom Layer 1" at 7846.56,3239.94 h60
  text "Pad" at 9566.04,3239.94 h60
  text "Rounded" at 10155.89,3239.94 h60
  text "c240h160" at 10901.69,3239.94 h60
  text "-" at 15432.38,3239.94 h60
  text "-" at 16522.06,3239.94 h60
  text "8" at 4867.38,3089.94 h60
  text "1.150mm (45.28mil)" at 5467.22,3089.94 h60
  text "PTH" at 6606.88,3089.94 h60
  text "Round" at 7112.76,3089.94 h60
  text "Top Layer 1 - Bottom Layer 1" at 7846.56,3089.94 h60
  text "Pad" at 9566.04,3089.94 h60
  text "(Mixed)" at 10155.89,3089.94 h60
  text "(Mixed)" at 10901.69,3089.94 h60
  text "-" at 15432.38,3089.94 h60
  text "-" at 16522.06,3089.94 h60
  text "14" at 4867.38,2939.94 h60
  text "0.889mm (35.00mil)" at 5467.22,2939.94 h60
  text "PTH" at 6606.88,2939.94 h60
  text "Round" at 7112.76,2939.94 h60
  text "Top Layer 1 - Bottom Layer 1" at 7846.56,2939.94 h60
  text "Pad" at 9566.04,2939.94 h60
  text "(Mixed)" at 10155.89,2939.94 h60
  text "(Mixed)" at 10901.69,2939.94 h60
  text "-" at 15432.38,2939.94 h60
  text "-" at 16522.06,2939.94 h60
  text "19" at 4867.38,2789.94 h60
  text "0.508mm (20.00mil)" at 5467.22,2789.94 h60
  text "PTH" at 6606.88,2789.94 h60
  text "Round" at 7112.76,2789.94 h60
  text "Top Layer 1 - Bottom Layer 1" at 7846.56,2789.94 h60
  text "Pad" at 9566.04,2789.94 h60
  text "Rounded" at 10155.89,2789.94 h60
  text "c102h51" at 10901.69,2789.94 h60
  text "-" at 15432.38,2789.94 h60
  text "-" at 16522.06,2789.94 h60
  text "35" at 4867.38,2639.94 h60
  text "1.200mm (47.24mil)" at 5467.22,2639.94 h60
  text "PTH" at 6606.88,2639.94 h60
  text "Round" at 7112.76,2639.94 h60
  text "Top Layer 1 - Bottom Layer 1" at 7846.56,2639.94 h60
  text "Pad" at 9566.04,2639.94 h60
  text "(Mixed)" at 10155.89,2639.94 h60
  text "(Mixed)" at 10901.69,2639.94 h60
  text "-" at 15432.38,2639.94 h60
  text "-" at 16522.06,2639.94 h60
  text "40" at 4867.38,2489.94 h60
  text "0.920mm (36.22mil)" at 5467.22,2489.94 h60
  text "PTH" at 6606.88,2489.94 h60
  text "Round" at 7112.76,2489.94 h60
  text "Top Layer 1 - Bottom Layer 1" at 7846.56,2489.94 h60
  text "Pad" at 9566.04,2489.94 h60
  text "Octagonal" at 10155.89,2489.94 h60
  text "s180h92c50" at 10901.69,2489.94 h60
  text "-" at 15432.38,2489.94 h60
  text "-" at 16522.06,2489.94 h60
  text "241" at 4867.38,2339.94 h60
  text "0.300mm (11.81mil)" at 5467.22,2339.94 h60
  text "PTH" at 6606.88,2339.94 h60
  text "Round" at 7112.76,2339.94 h60
  text "Top Layer 1 - Bottom Layer 1" at 7846.56,2339.94 h60
  text "Via" at 9566.04,2339.94 h60
  text "Rounded" at 10155.89,2339.94 h60
  text "(Mixed)" at 10901.69,2339.94 h60
  text "-" at 15432.38,2339.94 h60
  text "-" at 16522.06,2339.94 h60
  text "379 Total" at 4867.38,2189.94 h60
  text "Slot definitions :" at 4361.5,2044.97 h60
  text "Routed Path Length" at 5394.19,2044.97 h60
  text "= Calculated from tool start centre position to tool end centre position." at 6496.86,2044.97 h60
  text "Hole Length" at 5394.19,1944.99 h60
  text "= Routed Path Length + Tool Size = Slot length as defined in the PCB layout" at 6086.99,1944.99 h60
Bottom Component Center:
  circle w0.5: c3402,270 r157.48
Top Component Center:
  lines w6: 3622,210 3678,210 ; 3622,210 3622,188 3678,188 3678,210 ; 3622,210 3622,250 ; 3622,250 3678,250 ; 3622,250 3622,272 3678,272 3678,250 ; 3678,210 3678,250

## Dimensions
0,4150 to 0,0 on Dimension
3850,4150 to 0,4150 on Dimension

## Text inside footprints (layer, text, board x,y; h text height)
J4: Top Overlay "PCB Edge" at 3822.67,2347 h40 r90
J6: Top Overlay "1" at 2293,474 h50.03; Top Overlay "2" at 2293,385 h50.02; Top Overlay "13" at 1502,474 h50.03; Top Overlay "14" at 1502,384.94 h50.08
J10: Top Overlay "PCB Edge" at 3458.75,4119.91 h40 r180
J16: Top Overlay "PCB Edge" at 460,4131.67 h25 r180
J21: Top Overlay "PCB Edge" at 1113,4130.67 h25 r180